# Altium PCB slave.PcbDoc (part 3 of 8)
Units mm, origin at the board's own origin, x right, y up, seen from the top; angles counter-clockwise.
Board outline 160 x 100 mm, 6 copper layers (Top, FUSED_VBAT-, Signals1, Signals2, SUPPLY, Bottom), stack 1.67 mm thick; 597 components, 381 nets, 1695 pads, 3029 vias.
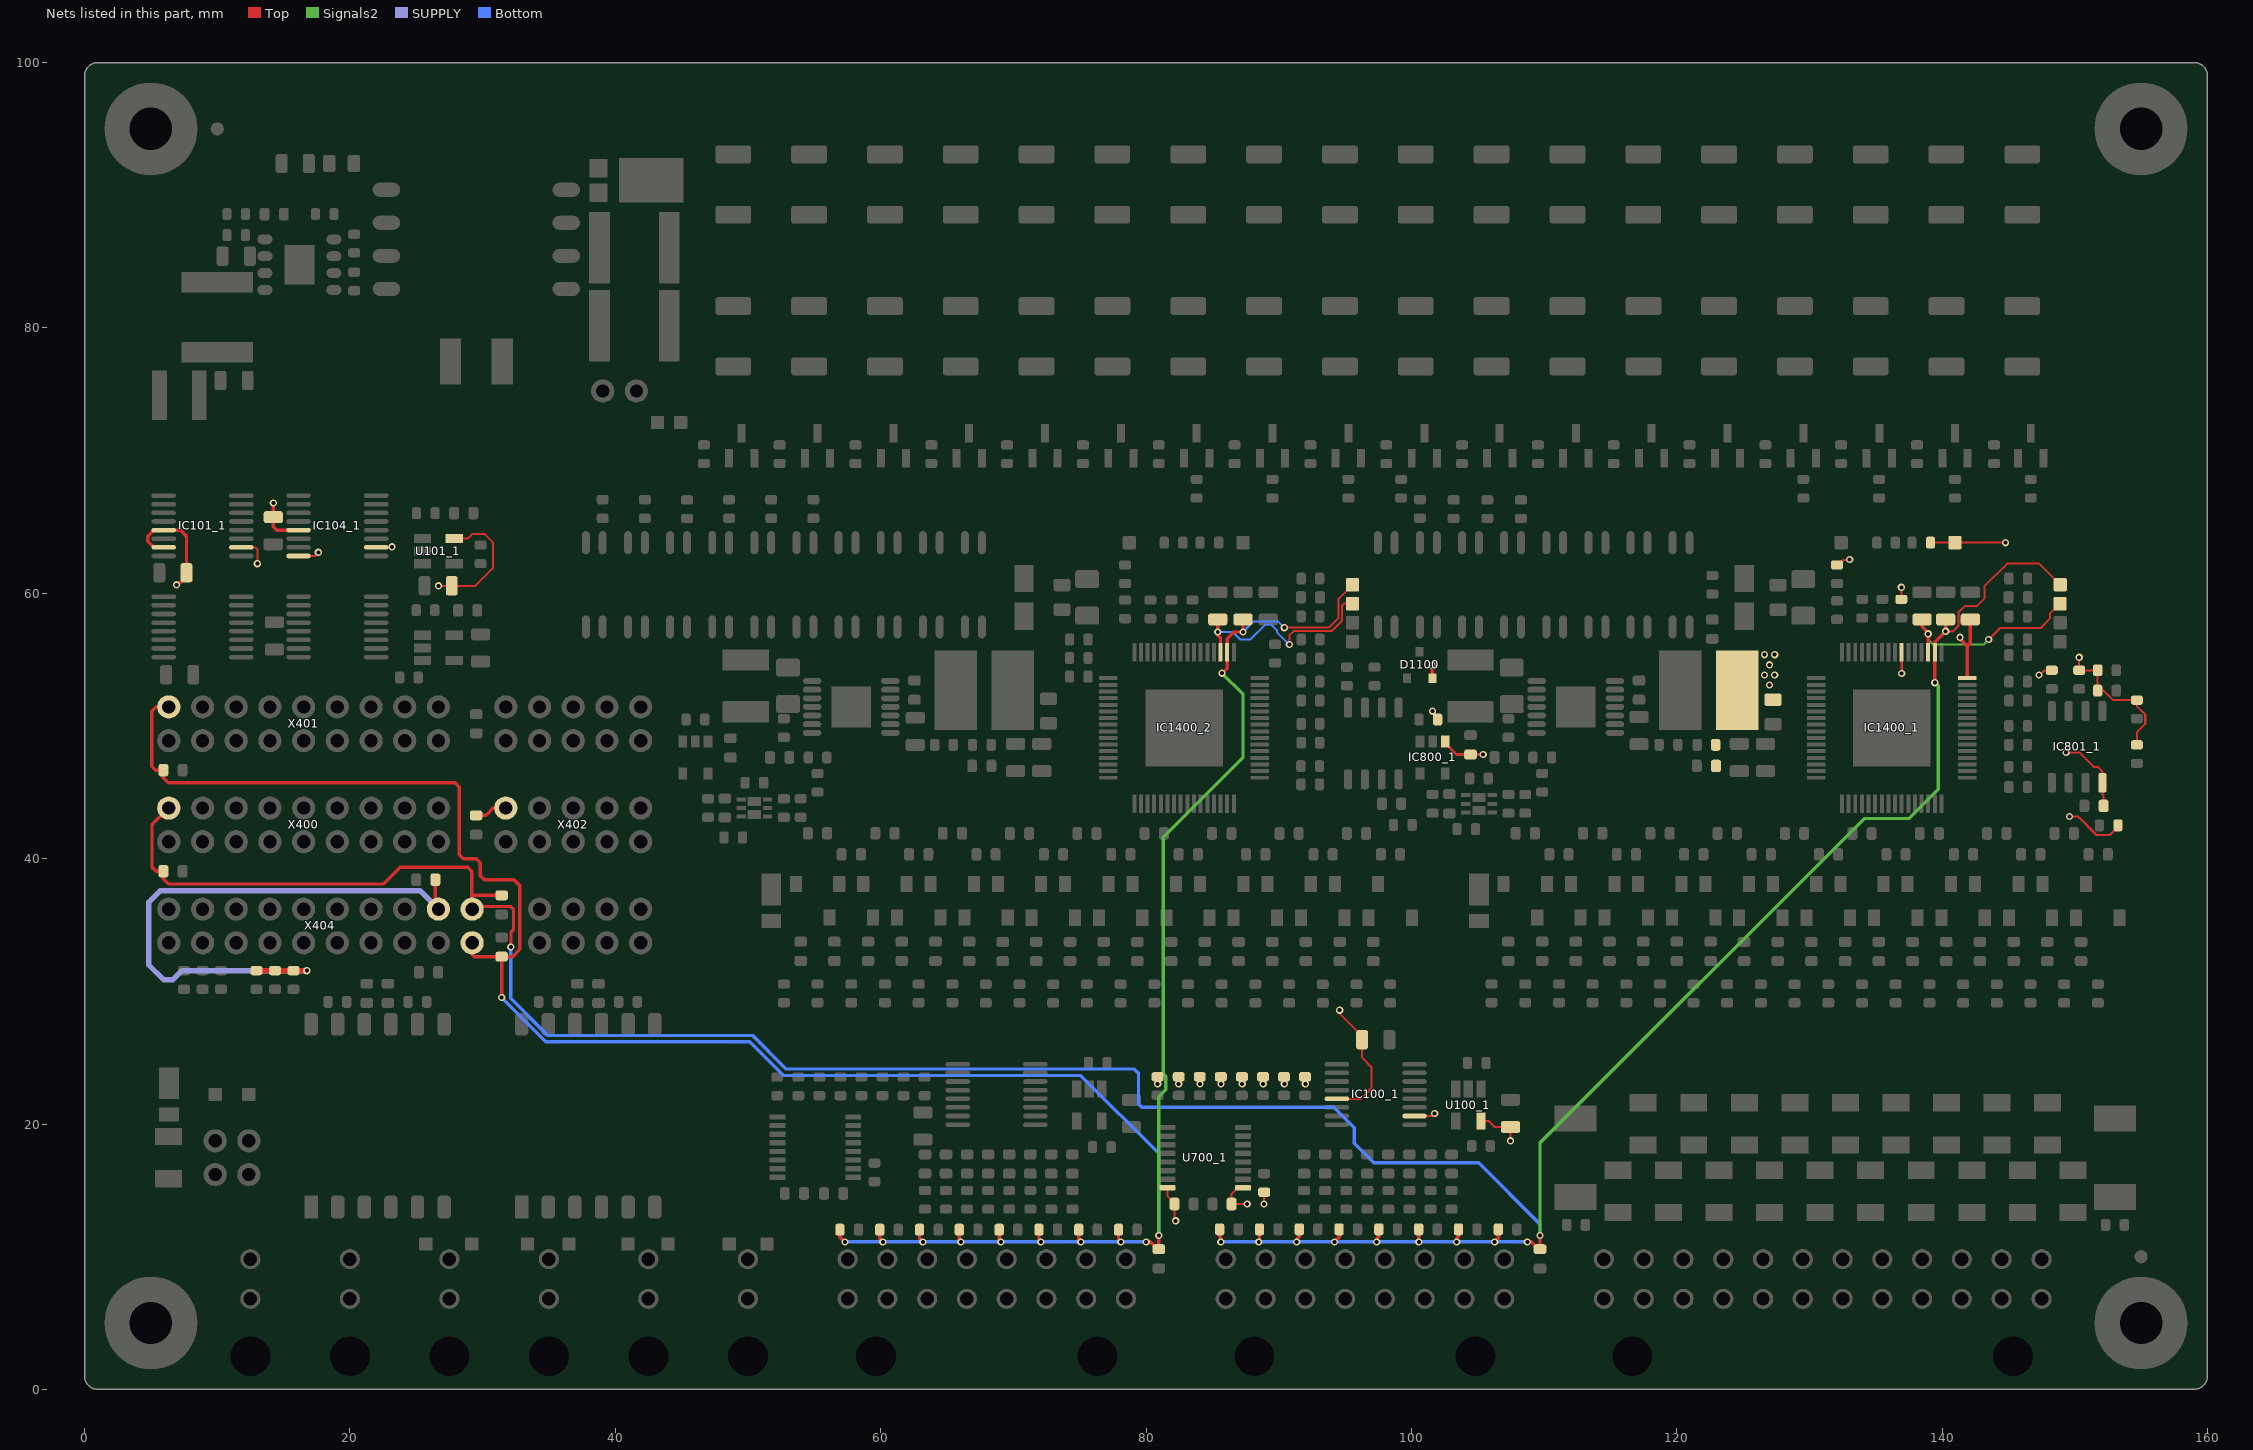
[diagram p6: the nets of this part, all layers, seen from the top]

## Via types
v1: diameter 0.55, hole 0.3, Top to Bottom, tented both sides, 2991 vias
v2: diameter 0.75, hole 0.5, Top to Bottom, tented both sides, 22 vias
v3: diameter 0.65, hole 0.4, Top to Bottom, tented both sides, 16 vias

## Nets (pads, with @x,y where several pads share a name; then routed paths per layer and width w, separated by ;. In a path a pad name is that pad's centre, name@x,y a point inside that pad or via, vN(x,y) a via of type N, cw(c..) or ccw(c..) an arc to the next point about the centre after c; other vN are vias at no path point) (continued)
+3.0V_VREF2_0: C100_1.2 C401.2 C405.2 C1402_1.2 IC1400_1.50 R100_1.2 R101_1.2 R102_1.2 R103_1.2 R104_1.2 R105_1.2 R106_1.2 R107_1.2 TP1402_1.1 X400.17 X404.1 | length 241.1
  Top w0.152: C100_1.2@109.596,10.567 C100_1.2@109.696,10.567 ; v1(140.272,57.13) 140.823,57.13 141.227,57.534 141.227,58.55 141.732,59.055 142.643,59.055 143.192,59.604 143.192,60.518 144.905,62.23 147.32,62.23 TP1402_1.1@148.907,60.642
  Top w0.254: C401.2@5.802,39.052 5.397,39.052 5.08,39.37 5.08,42.545 X400.17@6.35,43.815 ; C401.2@5.943,39.052 5.943,38.476 6.331,38.088 22.522,38.088 23.792,39.358 28.872,39.358 29.19,39.04 29.19,37.453 29.192,37.306 ; C405.2@31.432,37.237 29.261,37.237 29.192,37.306 ; v1(32.127,33.337) 32.136,33.347 32.136,34.448 32.329,34.641 32.329,36.169 32.107,36.391 29.21,36.391 X404.1@29.21,36.195 29.192,37.306 ; R100_1.2@85.553,12.061 85.553,11.509 85.64,11.422 v1(85.64,11.113) ; v1(88.497,11.113) 88.553,11.169 R101_1.2@88.553,12.061 ; v1(91.355,11.113) 91.355,11.311 91.553,11.509 R102_1.2@91.553,12.061 ; v1(94.212,11.113) 94.553,11.454 R103_1.2@94.553,12.061 ; v1(97.387,11.113) 97.387,11.343 97.553,11.509 R104_1.2@97.553,12.061 ; R105_1.2@100.553,12.061 100.553,11.123 v1(100.562,11.113) ; v1(103.42,11.113) 103.42,11.376 103.553,11.509 R106_1.2@103.553,12.061 ; v1(106.277,11.113) 106.553,11.389 R107_1.2@106.553,12.061 ; v1(108.744,11.112) 109.051,11.112 C100_1.2@109.596,10.567 ; C100_1.2@109.696,10.567 v1(109.696,11.589) ; v1(139.457,53.265) 139.457,56.316 v1(140.272,57.13) 140.272,57.936 C1402_1.2@140.017,58.19
  Signals2 w0.254: v1(109.696,11.589) 109.696,18.574 134.144,43.021 137.477,43.021 139.7,45.244 139.7,53.023 v1(139.457,53.265)
  Bottom w0.254: v1(32.127,33.337) 32.127,29.468 34.925,26.67 50.369,26.67 52.896,24.143 79.105,24.143 79.435,23.812 79.435,21.531 79.693,21.272 79.9,21.272 92.234,21.273 94.139,21.273 95.696,19.715 95.696,18.541 97.172,17.066 105.075,17.066 109.696,12.445 v1(109.696,11.589) ; v1(85.64,11.113) v1(88.497,11.113) v1(91.355,11.113) v1(94.212,11.113) v1(97.387,11.113) v1(100.562,11.113) v1(103.42,11.113) v1(106.277,11.113) v1@108.902,11.113 ; v1(108.744,11.112) v1@108.901,11.112
+3.0V_VREF2_1: C100_2.2 C400.2 C406.2 C1402_2.2 IC1400_2.50 R100_2.2 R101_2.2 R102_2.2 R103_2.2 R104_2.2 R105_2.2 R106_2.2 R107_2.2 TP1402_2.1 X401.17 X404.2 | length 209
  Top w0.152: C100_2.2@80.863,10.567 C100_2.2@80.962,10.567 ; v1(90.424,57.404) 93.769,57.404 94.52,58.154 94.52,59.595 TP1402_2.1@95.567,60.642
  Top w0.254: X401.17@6.35,51.435 5.377,51.423 5.06,51.105 5.06,46.978 5.365,46.672 C400.2@5.943,46.672 5.943,46.096 6.319,45.72 6.667,45.72 27.92,45.708 28.237,45.39 28.237,40.31 28.555,39.993 29.507,39.993 29.825,39.675 29.825,38.723 30.142,38.405 32.365,38.405 32.793,37.977 32.803,33.553 32.803,33.158 32.258,32.613 C406.2@31.432,32.613 ; X404.2@29.21,33.655 29.19,32.777 29.355,32.613 C406.2@31.432,32.613 ; v1(31.432,29.527) C406.2@31.432,32.613 ; R100_2.2@56.931,12.035 56.931,11.483 57.302,11.112 v1(57.309,11.112) ; R101_2.2@59.931,12.035 59.931,11.347 v1(60.166,11.112) ; R102_2.2@62.931,12.035 62.931,11.364 v1(63.182,11.112) ; R103_2.2@65.932,12.035 65.932,11.221 v1(66.04,11.112) ; R104_2.2@68.932,12.035 68.932,11.237 v1(69.056,11.112) ; R105_2.2@71.932,12.035 71.932,11.253 v1(72.072,11.112) ; R106_2.2@74.932,12.035 74.932,11.27 v1(75.089,11.112) ; R107_2.2@77.932,12.035 77.932,11.286 v1(78.105,11.112) ; v1(80.01,11.112) 80.318,11.112 C100_2.2@80.863,10.567 ; C100_2.2@80.962,10.567 v1(80.962,11.589) ; v1(85.725,53.975) 86.118,54.368 IC1400_2.50@86.118,55.547 86.118,56.577 86.624,57.083 v1(87.312,57.083) C1402_2.2@87.312,58.03
  Signals2 w0.254: v1(80.962,11.589) 80.962,22.057 81.483,22.577 81.483,23.61 81.29,23.803 81.29,41.602 87.312,47.625 87.312,52.387 v1(85.725,53.975)
  Bottom w0.152: v1(87.312,57.083) 88.121,57.892 89.936,57.892 v1(90.424,57.404)
  Bottom w0.254: v1(31.432,29.527) 34.756,26.204 50.144,26.204 52.694,23.654 75.089,23.654 80.962,17.78 v1(80.962,11.589) ; v1(57.309,11.112) v1(60.166,11.112) v1(63.182,11.112) v1(66.04,11.112) v1(69.056,11.112) v1(72.072,11.112) v1(75.089,11.112) v1(78.105,11.112) v1(80.01,11.112)
+5.0V_VREG_0: C101_1.2 C102_1.2 C103_1.2 C104_1.2 C105_1.2 C402.2 C404.2 C604_1.2 C700_1.2 C701_1.2 C800_1.2 C801_1.2 C1401_1.2 D1100.2 IC100_1.2 IC100_1.13 IC101_1.2 IC101_1.13 IC101_1.15 IC104_1.2 IC104_1.13 IC104_1.16 IC800_1.1 IC801_1.8 IC1400_1.48 IC1400_1.55 L600_1.2 LD1400_1.2 R602_1.1 R604_1.1 R700_1.2 R701_1.2 R702_1.2 R703_1.2 R704_1.2 R705_1.2 R706_1.2 R707_1.2 R708_1.1 R800_1.2 R801_1.2 R1404_1.2 R1407_1.2 R1419_1.2 R1420_1.2 R1421_1.2 R1422_1.2 R1423_1.2 R1424_1.2 R1425_1.2 R1426_1.2 R1427_1.2 TP1403_1.1 U100_1.5 U101_1.5 U700_1.1 U700_1.16 X402.9 X404.3 | length 145.6
  Top w0.152: IC101_1.2@11.786,63.462 12.861,63.462 13.018,63.305 v1(13.018,62.23) ; IC104_1.16@16.125,62.813 17.344,62.813 v1(17.621,63.09) ; IC104_1.2@21.946,63.462 23.139,63.462 v1(23.177,63.5) ; v1(26.67,60.567) C104_1.2@27.675,60.567 29.452,60.567 30.797,61.912 30.797,63.817 30.162,64.453 29.21,64.453 28.89,64.133 U101_1.5@27.87,64.133 ; v1(80.877,23.032) R707_1.2@80.877,23.561 R707_1.2@80.877,23.611 ; U700_1.16@81.605,15.188 81.605,14.607 82.143,14.07 C700_1.2@82.143,13.97 v1@82.143,12.79 ; v1(82.465,23.032) R706_1.2@82.465,23.561 R706_1.2@82.465,23.611 ; R705_1.2@84.052,23.561 84.052,23.052 v1(84.072,23.032) ; R705_1.2@84.052,23.611 84.072,23.591 R705_1.2@84.072,23.561 ; R704_1.2@85.64,23.561 85.64,23.052 v1(85.66,23.032) ; R704_1.2@85.64,23.611 85.66,23.591 R704_1.2@85.66,23.561 ; R703_1.2@87.227,23.561 87.227,23.052 v1(87.247,23.032) ; R703_1.2@87.227,23.611 87.247,23.591 R703_1.2@87.247,23.561 ; U700_1.1@87.305,15.188 86.905,15.188 86.45,14.733 C701_1.2@86.45,13.97 v1(87.63,13.97) ; R702_1.2@88.815,23.561 88.815,23.052 v1(88.835,23.032) ; R702_1.2@88.815,23.611 88.835,23.591 R702_1.2@88.835,23.561 ; v1(88.9,13.97) R708_1.1@88.9,14.857 ; R701_1.2@90.402,23.561 90.402,23.052 v1(90.422,23.032) ; R701_1.2@90.402,23.611 90.422,23.591 R701_1.2@90.422,23.561 ; R700_1.2@91.99,23.561 91.99,23.052 v1(92.01,23.032) ; R700_1.2@91.99,23.611 92.01,23.591 R700_1.2@92.01,23.561 ; IC100_1.13@94.389,21.9 96.185,21.9 96.996,22.711 96.996,24.289 96.289,24.996 C101_1.2@96.289,26.352 96.289,26.628 94.595,28.321 v1(94.595,28.575) ; IC100_1.2@100.239,20.6 101.563,20.6 v1(101.759,20.796) 101.759,20.637 v1@101.721,20.6 ; v1(101.6,51.117) 101.6,51.01 101.577,50.988 101.982,50.582 R800_1.2@101.982,50.482 ; U100_1.5@105.249,20.231 105.816,20.231 106.276,19.771 C103_1.2@107.474,19.771 v1(107.474,18.732) ; R1407_1.2@132.08,62.136 132.18,62.136 132.551,62.507 132.992,62.507 v1(133.032,62.547) ; R1404_1.2@136.93,59.537 v1(136.93,60.452) ; LD1400_1.2@139.18,63.817 TP1403_1.1@140.97,63.817 v1(144.78,63.817) ; v1(147.3,53.848) 147.37,53.848 147.721,54.199 R1419_1.2@148.273,54.199 ; v1(149.352,48.006) 150.348,48.006 151.429,46.925 151.728,46.925 152.082,46.57 IC801_1.8@152.082,45.719 152.082,44.867 152.172,44.777 C800_1.2@152.172,43.974 ; v1(149.606,43.18) 150.243,43.18 151.64,41.783 152.628,41.783 153.259,42.413 R801_1.2@153.259,42.513 ; v1(150.336,55.178) R1420_1.2@150.336,54.199 R1424_1.2@151.732,54.199 R1423_1.2@151.732,52.665 152.183,52.665 152.604,52.244 152.903,51.944 R1422_1.2@154.686,51.944 154.686,51.493 155.314,50.866 155.314,50.158 154.686,49.53 R1421_1.2@154.686,48.579
  Top w0.203: IC800_1.1@102.55,48.825 102.55,48.7 103.398,47.853 C801_1.2@104.457,47.853 v1(105.41,47.853) ; v1(136.958,53.95) IC1400_1.55@136.958,55.547
  Top w0.254: IC101_1.15@5.965,63.463 5.215,63.463 4.763,63.915 4.763,64.31 5.215,64.763 IC101_1.13@5.965,64.763 7.235,64.763 7.68,64.317 C102_1.2@7.68,61.552 7.68,61.277 7.211,60.807 7.086,60.807 v1(6.921,60.642) ; v1(14.224,66.802) C105_1.2@14.224,65.743 14.224,65.024 14.485,64.763 IC104_1.13@16.125,64.763 ; C404.2@26.442,38.417 26.442,36.423 X404.3@26.67,36.195 ; C402.2@29.507,43.258 30.233,43.258 30.373,43.397 30.777,43.803 X402.9@31.75,43.815 ; D1100.2@101.577,53.598 v1(101.577,54.587) ; v1(141.351,56.683) 141.351,56.556 141.908,56 ; IC1400_1.48@141.908,53.597 141.908,56 ; C1401_1.2@142.13,58.03 142.13,56.222 141.908,56
  Top w0.406: R1427_1.2@12.954,31.561 R1426_1.2@14.351,31.561 R1425_1.2@15.748,31.561 v1(16.748,31.561) v1@16.764,31.561
  SUPPLY w0.406: v1(16.748,31.561) 7.344,31.561 6.663,30.88 5.95,30.88 4.826,32.004 4.826,36.703 5.715,37.592 25.273,37.592 X404.3@26.67,36.195
  other v1: 82.233,12.7 127,53.086 126.619,53.848 127.381,53.848 127,54.61 126.619,55.372 127.381,55.372